# Altium PCB PCB_esp32.PcbDoc
Units mm, origin at the board's own origin, x right, y up, seen from the top; angles counter-clockwise.
Board outline 93.09 x 63.64 mm, 2 copper layers (Top Layer, Bottom Layer); 68 components, 49 nets, 270 pads, 139 vias.
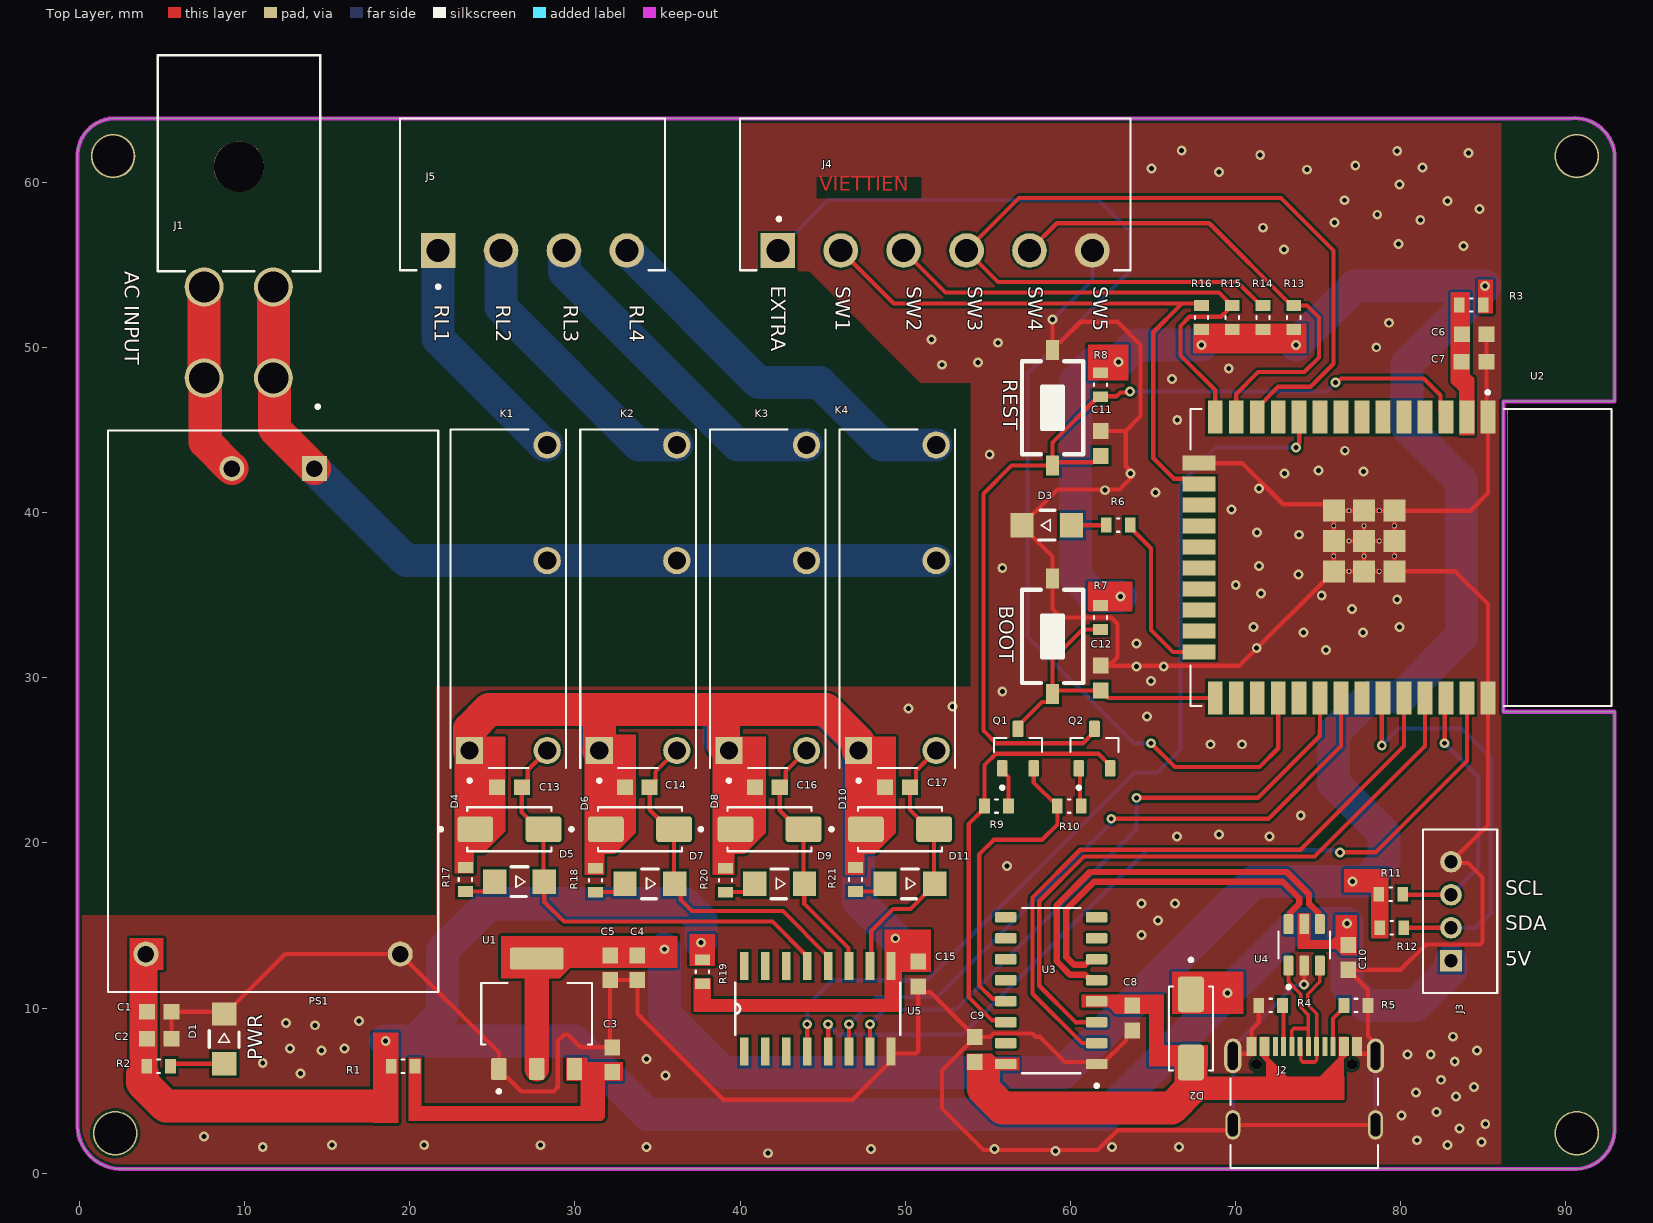
[diagram p0: Top Layer view]
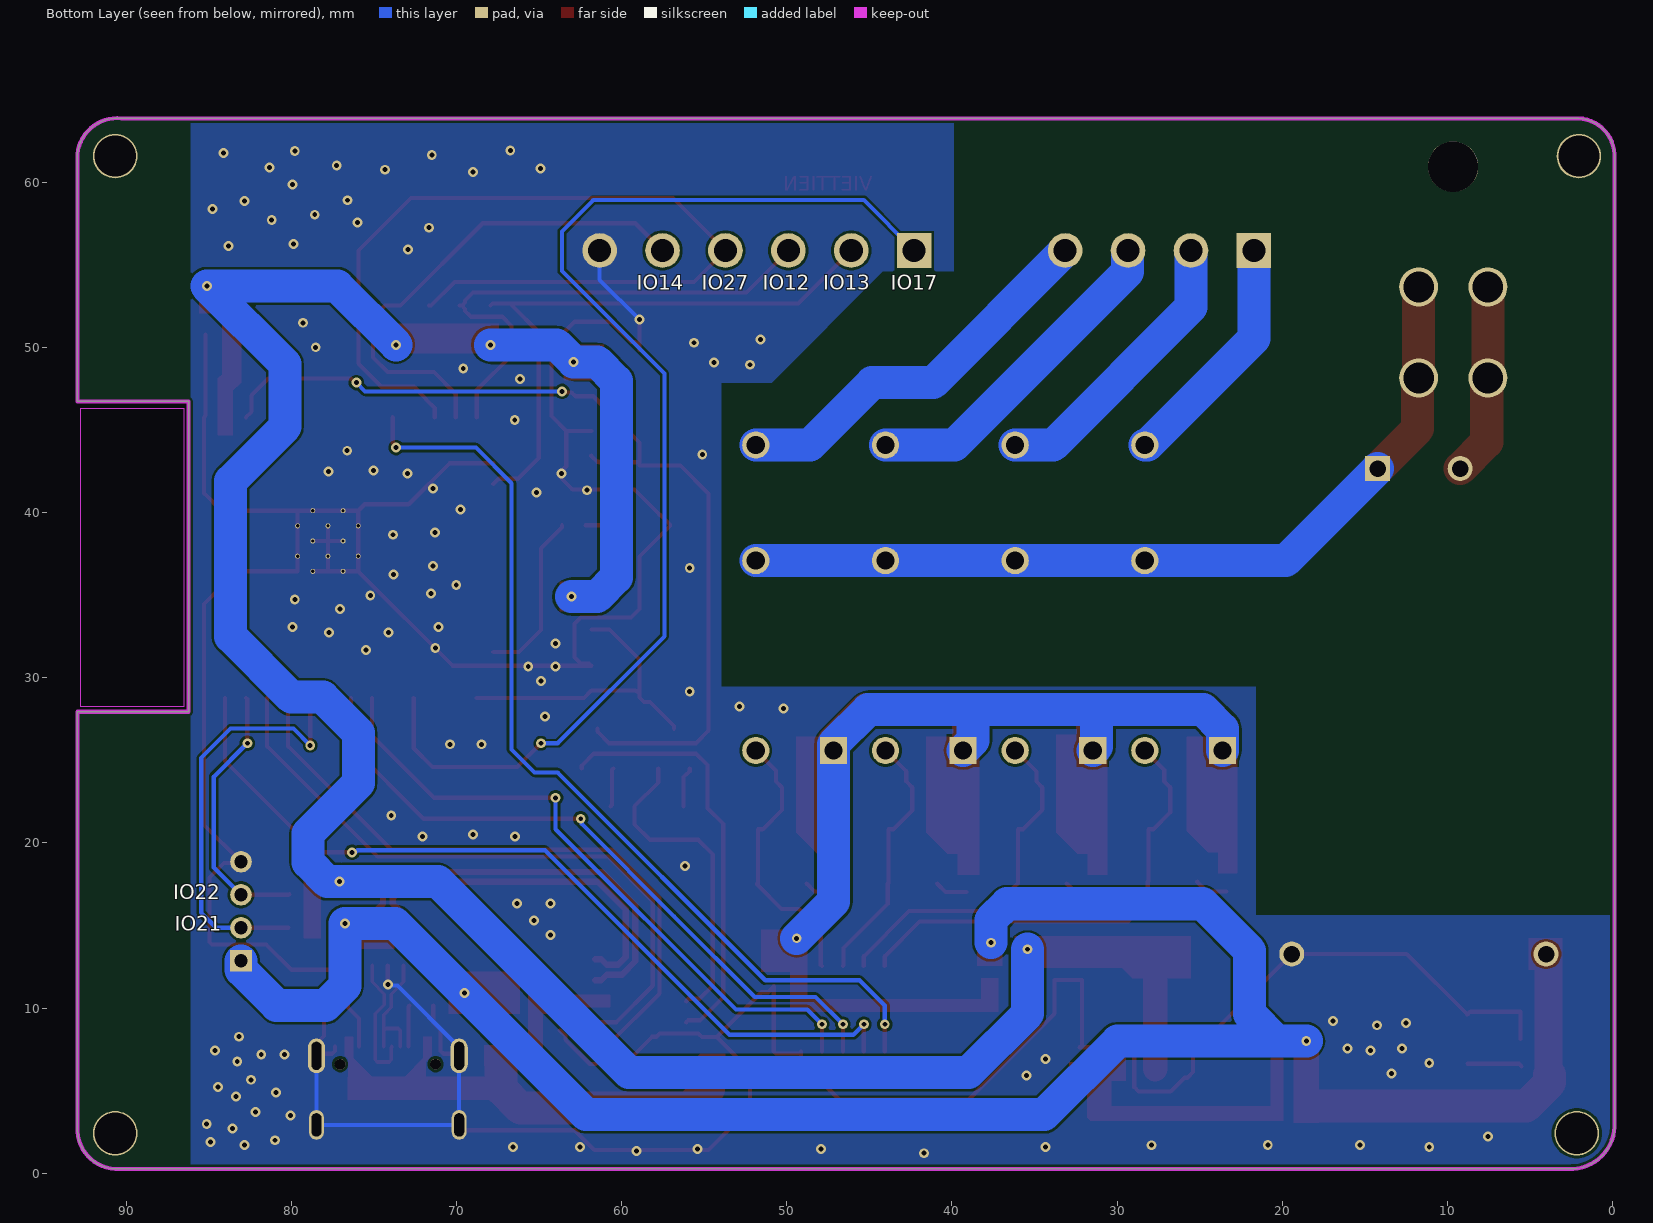
[diagram p1: Bottom Layer view, seen from below]
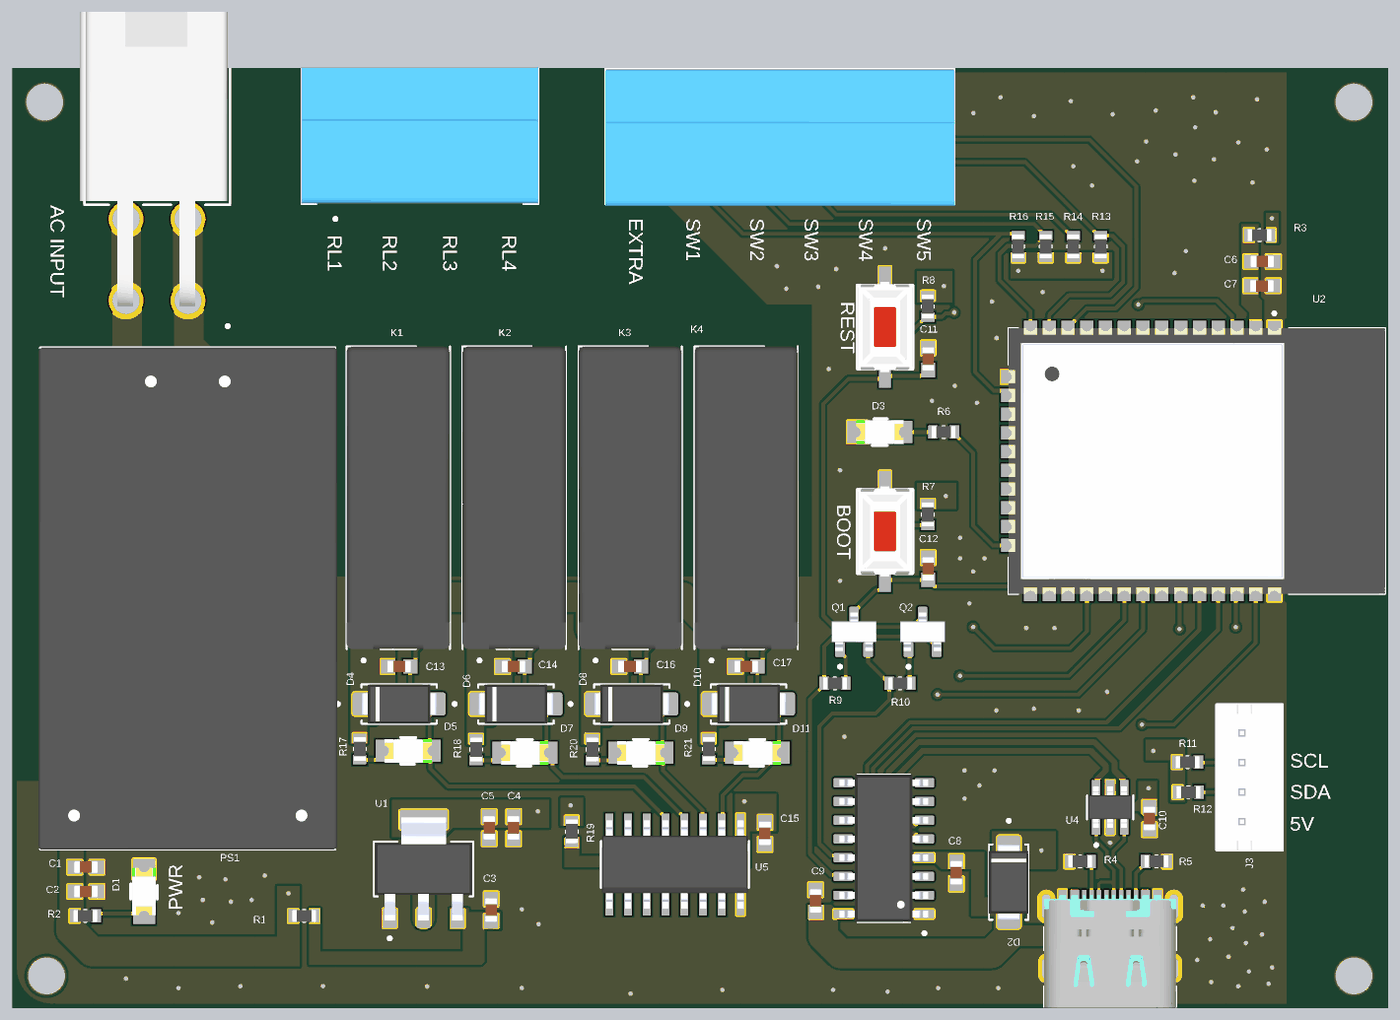
[diagram p2: 3D render of the assembled board from above, using the file's embedded part models]

## Layer stack, top to bottom
Top Solder: solder mask 0.0102, Solder Resist, Dk 3.5
Top Layer: signal copper 0.0356
Dielectric 1: dielectric 0.32, FR-4, Dk 4.8
Bottom Layer: signal copper 0.0356
Bottom Solder: solder mask 0.0102, Solder Resist, Dk 3.5

## Board outline
-0.127,2.794 -0.127,61.468 cw(c2.159,61.595) 2.032,63.881 90.297,63.881 cw(c90.551,61.468) 92.964,61.722 92.964,46.736 86.233,46.736 86.233,27.94 92.964,27.94 92.964,2.794 cw(c90.551,2.667) 90.678,0.254 2.667,0.254 cw(c2.54,2.921)

## Design rules (kind name [scope] priority, off if disabled: settings)
Clearance [All] p1: gap=0.154 ignorepadtopadclearanceinfootprint=FALSE
DiffPairsRouting [All] p1: maxlimit=0.5 minlimit=0.15 mostfreqgap=0.2 toplayer_minwidth=0.15 toplayer_maxwidth=0.387 toplayer_prefwidth=0.387 bottomlayer_minwidth=0.15 bottomlayer_maxwidth=0.387 bottomlayer_prefwidth=0.387 impedanceprofiledriven=TRUE impedanceprofileid={6402B947-823C-461C-932C-7CAD535EB74E} impedanceprofilevalue=90.000000 maxuncoupledlength=12.7
HoleSize [All] p1: absolutevalues=TRUE maxlimit=10 minlimit=0.025 maxpercent=80.000 minpercent=20.000
MinimumSolderMaskSliver [All] p1: minsoldermaskwidth=0.01
PolygonConnect [All] p1: connectstyle=Direct reliefconductorwidth=0.254 reliefentries=4 polygonreliefangle="90 Angle" airgapwidth=0.254
RoutingVias [All] p1: holewidth=0.3 width=0.6 viastyle="Through Hole" minholewidth=0.3 minwidth=0.6 maxholewidth=0.3 maxwidth=0.6
SilkToSolderMaskClearance [IsPad] p1: minsilkscreentomaskgap=0.154 clearancetoexposedcopper=TRUE
SolderMaskExpansion [All] p1: expansion=0.102 istentingtop=FALSE
Width [All] p1: maxlimit=5 minlimit=0.254 preferedwidth=2
26 further rules are at their usual default settings.

## Classes and differential pairs
component class vi_xu_ly: BOOT C6 C7 C8 C9 C10 C11 C12 D2 D3 J2 J3 J4 Q1 Q2 R3 R4 R5 R6 R7 R8 R9 R10 R11 R12 R13 R14 R15 R16 REST U2 U3 U4
component class relay: C13 C14 C15 C16 C17 D4 D5 D6 D7 D8 D9 D10 D11 J5 K1 K2 K3 K4 R17 R18 R19 R20 R21 U5
component class Nguon: C1 C2 C3 C4 C5 D1 J1 PS1 R1 R2 U1
differential pair U: +U_P -U_N
differential pair USB: +USB_P -USB_N

## Components (designator, comment, footprint, x,y, rotation, side; value= is the part's Value field where it differs from the comment)
BOOT "Nut Nhan 2 Chan SMD 3x6x2.5" PCBComponent_1 60.706,28.448 r90 top
C1 "0.1uF" CAPC1608X94N 4.826,9.779 r180 top
C2 "10uF" CAPC1608X94N 4.826,8.128 r180 top
C3 "10uF" CAPC1608X94N 32.258,6.87 r270 top
C4 "0.1uF" CAPC1608X94N 33.782,12.446 r90 top
C5 "10uF" CAPC1608X94N 32.131,12.446 r90 top
C6 "0.1uF" CAPC1608X94N 84.467,50.8 r180 top
C7 "0.1uF" CAPC1608X94N 84.455,49.149 r180 top
C8 "0.1uF" CAPC1608X94N 63.754,9.398 r90 top
C9 "0.1uF" CAPC1608X94N 54.229,7.493 r270 top
C10 "0.1uF" CAPC1608X94N 76.835,13.069 r270 top
C11 "0.1uF" CAPC1608X94N 61.849,44.196 r90 top
C12 "0.1uF" CAPC1608X94N 61.849,29.984 r90 top
C13 "0.1uF" CAPC1608X94N 26.035,23.368 r180 top
C14 "0.1uF" CAPC1608X94N 33.782,23.368 r180 top
C15 "0.1uF" CAPC1608X94N 50.8,12.065 r90 top
C16 "0.1uF" CAPC1608X94N 41.656,23.368 r180 top
C17 "0.1uF" CAPC1608X94N 49.542,23.368 r180 top
D1 "WL-SMCW_1206" WL-SMCW_1206 8.763,8.128 r270 top
D2 "B340A-E3/61T" DIOM5126X229N 67.31,8.763 r270 top
D3 "WL-SMCW_1206" WL-SMCW_1206 58.571,39.243 r0 top
D4 "B340A-E3/61T" DIOM5126X229N 26.035,20.828 r0 top
D5 "WL-SMCW_1206" WL-SMCW_1206 26.646,17.653 r180 top
D6 "B340A-E3/61T" DIOM5126X229N 33.942,20.828 r0 top
D7 "WL-SMCW_1206" WL-SMCW_1206 34.544,17.526 r180 top
D8 "B340A-E3/61T" DIOM5126X229N 41.783,20.828 r0 top
D9 "WL-SMCW_1206" WL-SMCW_1206 42.394,17.526 r180 top
D10 "B340A-E3/61T" DIOM5126X229N 49.69,20.828 r0 top
D11 "WL-SMCW_1206" WL-SMCW_1206 50.292,17.526 r180 top
J1 "39301040" CONN_5569-04A_MOL 7.544,53.67 r180 top
J2 "TypeC_12pin_12402012E212A" TypeC_12pin_12402012E212A 74.168,2.921 r0 top
J3 "B4B-PH-K-S" JST_B4B-PH-K-S 83.608,15.859 r270 top
J4 "TBP02R1-381-06BE" CUI_TBP02R1-381-06BE 42.291,55.88 r0 top
J5 "TBP02R1-381-04BE" CUI_TBP02R1-381-04BE 21.717,55.88 r0 top
K1 "HF46F_005-HS1" RELAY_HF46F_005-HS1 25.971,34.798 r90 top locked
K2 "HF46F_005-HS1" RELAY_HF46F_005-HS1 33.824,34.798 r90 top locked
K3 "HF46F_005-HS1" RELAY_HF46F_005-HS1 41.677,34.798 r90 top locked
K4 "HF46F_005-HS1" RELAY_HF46F_005-HS1 49.53,34.798 r90 top locked
PS1 "HLK-PM01" CONV_HLK-PM01 11.724,27.972 r270 top locked
Q1 "MMBT3904" TRANS_MMBT3904 56.835,25.711 r90 top
Q2 "MMBT3904" TRANS_MMBT3904 61.468,25.711 r90 top
R1 "0R" RES_ERJU03J474V 19.595,6.477 r0 top
R2 "10K" RES_ERJU03J474V 4.789,6.477 r0 top
R3 "0R" RES_ERJU03J474V 84.291,52.578 r180 top
R4 "5K1" RES_ERJU03J474V 72.136,10.16 r0 top
R5 "5K1" RES_ERJU03J474V 77.306,10.16 r180 top
R6 "10k" RES_ERJU03J474V 62.902,39.243 r180 top
R7 "10k" RES_ERJU03J474V 61.829,33.655 r270 top
R8 "10k" RES_ERJU03J474V 61.829,47.752 r270 top
R9 "1K" RES_ERJU03J474V 55.536,22.225 r180 top
R10 "1k" RES_ERJU03J474V 59.944,22.225 r180 top
R11 "10k" RES_ERJU03J474V 79.412,16.891 r0 top
R12 "10k" RES_ERJU03J474V 79.465,14.859 r0 top
R13 "10k" RES_ERJU03J474V 73.533,51.816 r90 top
R14 "10k" RES_ERJU03J474V 71.67,51.816 r90 top
R15 "10k" RES_ERJU03J474V 69.808,51.816 r90 top
R16 "10k" RES_ERJU03J474V 67.945,51.816 r90 top
R17 "10K" RES_ERJU03J474V 23.368,17.78 r270 top
R18 "10K" RES_ERJU03J474V 31.242,17.743 r270 top
R19 "0R" RES_ERJU03J474V 37.719,12.192 r90 top
R20 "10K" RES_ERJU03J474V 39.116,17.743 r270 top
R21 "10K" RES_ERJU03J474V 46.99,17.78 r270 top
REST "Nut Nhan 2 Chan SMD 3x6x2.5" PCBComponent_1 60.706,42.291 r90 top
U1 "AMS1117" SOT229P700X180-4N 27.686,9.652 r90 top
U2 "ESP32-WROOM-32" MODULE_ESP32-WROOM-32 80.034,37.284 r270 top
U3 "CH340C" CH340C 58.845,11.049 r180 top
U4 "USBLC6-2SC6" USBLC6-2SC6 74.168,13.828 r90 top
U5 "ULN2003AD" SOIC127P600X175-16N 44.704,9.957 r90 top

## Footprints (in the part's own frame and the unit in brackets; to place one, negate y for a bottom-side part, rotate by r counter-clockwise, add the part's x,y. Pads: shape width x height; smd on the part's side, far side on the other; paste and mask are expansions set on the pad)
CAPC1608X94N [mm]
  rect 0.97x0.94 smd paste+0 mask+0.102: 1(-0.75,0) 2(0.75,0)
  body extent -0.8,-0.4 0.8,0.4, height 0.94
CH340C [mm]
  rrect25% 1.31x0.62 smd: 1(-2.75,4.445) 2(-2.75,3.175) 3(-2.75,1.905) 4(-2.75,0.635) 5(-2.75,-0.635) 6(-2.75,-1.905) 7(-2.75,-3.175) 8(-2.75,-4.445) 9(2.75,-4.445) 10(2.75,-3.175) 11(2.75,-1.905) 12(2.75,-0.635) 13(2.75,0.635) 14(2.75,1.905) 15(2.75,3.175) 16(2.75,4.445)
  silkscreen extent -2.85,-5 1.78,5.85, body extent -3,-5 3,5, height 1.8
CONN_5569-04A_MOL [mil]
  round 93 hole 73 mask+4.02: 1(0,0) 2(0,217) 3(-165,217) 4(-165,0)
  round 120 hole 120 unplated mask+0: ""(-83,-287)
  silkscreen extent -277,-552 111,-38, body extent -270,-552 124,232, height 449
CONV_HLK-PM01 [mm]
  rect 1.508x1.508 / inner round 1.508 / far side rect 1.508x1.508 hole 1: 1(-14.7,2.5)
  round 1.508 hole 1: 2(-14.7,-2.5) 3(14.7,7.7) 4(14.7,-7.7)
  silkscreen extent -18.55,-10 17,10, body extent -17,-10.1 17,10.1, height 15
CUI_TBP02R1-381-04BE [mm]
  rect 2.1x2.1 / inner round 2.1 / far side rect 2.1x2.1 hole 1.4: 1(0,0)
  round 2.1 hole 1.4: 2(3.81,0) 3(7.62,0) 4(11.43,0)
  silkscreen extent -2.3,-2.3 13.73,8, body extent -2.3,-1.14 13.73,8.06, height 7.4
CUI_TBP02R1-381-06BE [mm]
  rect 2.1x2.1 / inner round 2.1 / far side rect 2.1x2.1 hole 1.4: 1(0,0)
  round 2.1 hole 1.4: 2(3.81,0) 3(7.62,0) 4(11.43,0) 5(15.24,0) 6(19.05,0)
  silkscreen extent -2.3,-1.2 21.35,8, body extent -2.3,-1.33 21.35,7.87, height 7.14
DIOM5126X229N [mm]
  rrect25% 2.17x1.57 smd: A(2.065,0) C(-2.065,0)
  silkscreen extent -4.25,-1.33 2.55,1.33, body extent -2.55,-1.33 2.55,1.33, height 2.29
JST_B4B-PH-K-S [mm]
  rect 1.308x1.308 / inner round 1.308 / far side rect 1.308x1.308 hole 0.8: 1(3,-0.55)
  round 1.308 hole 0.8: 2(1,-0.55) 3(-1,-0.55) 4(-3,-0.55)
  silkscreen extent -4.95,-2.25 4.95,2.25, body extent -4.95,-2.21 4.95,2.29, height 6.05
MODULE_ESP32-WROOM-32 [mm]
  rect 2x0.9 smd: 1(-8.5,5.26) 2(-8.5,3.99) 3(-8.5,2.72) 4(-8.5,1.45) 5(-8.5,0.18) 6(-8.5,-1.09) 7(-8.5,-2.36) 8(-8.5,-3.63) 9(-8.5,-4.9) 10(-8.5,-6.17) 11(-8.5,-7.44) 12(-8.5,-8.71) 13(-8.5,-9.98) 14(-8.5,-11.25) 25(8.5,-11.25) 26(8.5,-9.98) 27(8.5,-8.71) 28(8.5,-7.44) 29(8.5,-6.17) 30(8.5,-4.9) 31(8.5,-3.63) 32(8.5,-2.36) 33(8.5,-1.09) 34(8.5,0.18) 35(8.5,1.45) 36(8.5,2.72) 37(8.5,3.99) 38(8.5,5.26)
  rect 0.9x2 smd: 15(-5.715,-12.25) 16(-4.445,-12.25) 17(-3.175,-12.25) 18(-1.905,-12.25) 19(-0.635,-12.25) 20(0.635,-12.25) 21(1.905,-12.25) 22(3.175,-12.25) 23(4.445,-12.25) 24(5.715,-12.25)
  rect 1.33x1.33 smd: 39_1(-2.835,-0.405) 39_2(-1,-0.405) 39_3(0.835,-0.405) 39_4(-2.835,-2.24) 39_5(-1,-2.24) 39_6(0.835,-2.24) 39_7(-2.835,-4.075) 39_8(-1,-4.075) 39_9(0.835,-4.075)
  round 0.3 hole 0.2: 39_10(-1.917,-0.405) 39_11(-0.082,-0.405) 39_12(-2.835,-1.322) 39_13(-1,-1.322) 39_14(0.835,-1.322) 39_15(-1.917,-2.24) 39_16(-0.082,-2.24) 39_17(-2.835,-3.157) 39_18(-1,-3.157) 39_19(0.835,-3.157) 39_20(-1.917,-4.075) 39_21(-0.082,-4.075)
  Keep-Out Layer region: 9,6.45 -9,6.45 -9,12.75 9,12.75
  Keep-Out Layer region: 9,6.45 -9,6.45 -9,12.75 9,12.75
  silkscreen extent -10.1,-12.75 9,12.75, body extent -9,-12.75 9,12.75, height 3.2
PCBComponent_1 [mm]
  rect 1.2x0.8 smd: 1(0.564,1.778) 2(7.564,1.778)
  silkscreen extent 1.24,-0.08 6.88,3.63, body extent 1.01,-0.07 7.11,3.63, height 2.5
RELAY_HF46F_005-HS1 [mm]
  rect 1.65x1.65 / inner round 1.65 / far side rect 1.65x1.65 hole 1.1: 1(-9.2,2.35)
  round 1.65 hole 1.1: 2(-9.2,-2.35) 3(2.3,-2.35) 4(9.3,-2.35)
  silkscreen extent -11.12,-3.5 10.25,3.5, body extent -10.25,-3.5 10.25,3.5, height 15.6
RES_ERJU03J474V [mm]
  rect 0.65x0.9 smd: 1(-0.725,0) 2(0.725,0)
  silkscreen extent -0.08,-0.4 0.08,0.4, body extent -0.8,-0.4 0.8,0.4, height 0.45
SOIC127P600X175-16N [mil]
  rect 67x21 smd: 1(-102,175) 2(-102,125) 3(-102,75) 4(-102,25) 5(-102,-25) 6(-102,-75) 7(-102,-125) 8(-102,-175) 9(102,-175) 10(102,-125) 11(102,-75) 12(102,-25) 13(102,25) 14(102,75) 15(102,125) 16(102,175)
  silkscreen extent -62,-197 62,197, body extent -118,-195 118,195, height 69
SOT229P700X180-4N [mm]
  rrect15% 1.31x0.93 smd: 1(-3.345,2.29) 2(-3.345,0) 3(-3.345,-2.29)
  rrect15% 1.31x3.24 smd: 2(3.345,0)
  silkscreen extent -4.8,-3.36 1.86,3.36, body extent -3.5,-3.25 3.5,3.25, height 1.8
TRANS_MMBT3904 [mm]
  rrect25% 1x0.65 smd paste+0 mask+0.102: 1(-1.2,0.95) 2(-1.2,-0.95) 3(1.2,0)
  silkscreen extent -2.46,-1.45 0.65,1.45, body extent -1.3,-1.52 1.3,1.52, height 1.3
TypeC_12pin_12402012E212A [mm]
  rect 0.6x1.14 smd: A1_B12(-3.2,4.75) A4_B9(-2.4,4.75) B1_A12(3.2,4.75) B4_A9(2.4,4.75)
  rect 0.3x1.14 smd: A5(-1.25,4.75) A6(-0.25,4.75) A7(0.25,4.75) A8(1.25,4.75) B5(1.75,4.75) B6(0.75,4.75) B7(-0.75,4.75) B8(-1.75,4.75)
  oval 1.05x2.1 hole 0.6 slot 1.7 at 90 deg: SH1(-4.32,4.18) SH2(4.32,4.18)
  oval 0.9x1.8 hole 0.6 slot 1.4 at 90 deg: SH3(-4.32,0) SH4(4.32,0)
  round 0.65 hole 0.65 unplated: ""(-2.89,3.68) ""(2.89,3.68)
  silkscreen extent -4.47,-2.6 4.47,2.81, body extent -4.47,-2.65 4.47,4.95, height 3.15
USBLC6-2SC6 [mm]
  rrect25% 1.21x0.59 smd: 1(-1.255,0.95) 2(-1.255,0) 3(-1.255,-0.95) 4(1.255,-0.95) 5(1.255,0) 6(1.255,0.95)
  silkscreen extent -2.65,-1.57 0.81,1.56, body extent -1.4,-1.46 1.4,1.46, height 1.44
WL-SMCW_1206 [mm]
  rect 1.4x1.5 smd: 1(-1.5,0) 2(1.5,0)
  silkscreen extent -0.5,-0.9 0.5,0.9, body extent -1.6,-0.8 1.6,0.8, height 0.68

## Part data
C1 C2 C3 C4 C5 C6 C7 C8 C9 C10 C11 C12 C13 C14 C15 C16 C17: library part cap_0603_VJ0603D3R9DXCAP, "cap 0603 (1608 Metric)", Package="1608 Vishay Vitramon", Check_prices=https://www.snapeda.com/parts/VJ0603D3R9DXCAP/Vishay/view-part/?ref=eda, MF="Vishay Vitramon", MP=VJ0603D3R9DXCAP, SnapEDA_Link=https://www.snapeda.com/parts/VJ0603D3R9DXCAP/Vishay/view-part/?ref=snap
D1 D5 D7 D9 D11: "1206, Blue Typ.(@20mA): 470nm, 145mcd, 3.2V, 140Â° InGaN", Package="1206 Wurth Electronics", Check_prices=https://www.snapeda.com/parts/150120BS75000/Wurth+Electronics/view-part/?ref=eda, MF="Wurth Electronics", MP=150120BS75000, SnapEDA_Link=https://www.snapeda.com/parts/150120BS75000/Wurth+Electronics/view-part/?ref=snap
D2 D4 D6 D8 D10: "Diode Schottky 40 V 3A Surface Mount DO-214AC (SMA)", Package="DO-214 Vishay Semiconductor", Check_prices=https://www.snapeda.com/parts/B340A-E3/61T/Vishay/view-part/?ref=eda, MF="Vishay Semiconductor", MP=B340A-E3/61T, SnapEDA_Link=https://www.snapeda.com/parts/B340A-E3/61T/Vishay/view-part/?ref=snap
D3: "1206, Blue Typ.(@20mA): 470nm, 145mcd, 2.9V, 140Â° InGaN", Package="1206 Wurth Electronics", Check_prices=https://www.snapeda.com/parts/150120BS75000/Wurth+Electronics/view-part/?ref=eda, MF="Wurth Electronics", MP=150120BS75000, SnapEDA_Link=https://www.snapeda.com/parts/150120BS75000/Wurth+Electronics/view-part/?ref=snap
J1: "Conn Wire to Board HDR 4 POS 4.2mm Solder RA Side Entry Thru-Hole Mini-Fit Jrâ„¢ Bag", Package=None, Check_prices=https://www.snapeda.com/parts/39301040/Molex/view-part/?ref=eda, MF=Molex, MP=39301040, SnapEDA_Link=https://www.snapeda.com/parts/39301040/Molex/view-part/?ref=snap
J2: "USB2.0, Type C, Top mount, CH 1.68mm, Dual Row SMT", Package=None, Availability="In Stock", Check_prices=https://www.snapeda.com/parts/12402012E212A/Amphenol/view-part/?ref=eda, MF="Amphenol ICC (Commercial Products)", MP=12402012E212A, Price=None, Purchase-URL=https://pricing.snapeda.com/search/part/12402012E212A/?ref=eda, SnapEDA_Link=https://www.snapeda.com/parts/12402012E212A/Amphenol/view-part/?ref=snap
J3: Package=None, Availability=Unavailable, MF="{'manufacturer': u'JST Sales America Inc.'}", MP=B4B-PH-K-S, Price=None
J4 J5: "2~24 Poles, Pluggable,Receptacle, Horizontal, 3.81 Pitch, Terminal Block Connector", Package=None, MF="Same Sky"
  J4: Check_prices=https://www.snapeda.com/parts/TBP02R1-381-06BE/Same+Sky/view-part/?ref=eda, MP=TBP02R1-381-06BE, SnapEDA_Link=https://www.snapeda.com/parts/TBP02R1-381-06BE/Same+Sky/view-part/?ref=snap
  J5: Check_prices=https://www.snapeda.com/parts/TBP02R1-381-04BE/Same+Sky/view-part/?ref=eda, MP=TBP02R1-381-04BE, SnapEDA_Link=https://www.snapeda.com/parts/TBP02R1-381-04BE/Same+Sky/view-part/?ref=snap
K1 K2 K3 K4: "Relay: electromagnetic; SPST-NO; Ucoil: 5VDC; 5A/250VAC; 5A/30VDC", Package=None, Check_prices=https://www.snapeda.com/parts/HF46F/005-HS1/Hongfa/view-part/?ref=eda, MF=Hongfa, MP=HF46F/005-HS1, SnapEDA_Link=https://www.snapeda.com/parts/HF46F/005-HS1/Hongfa/view-part/?ref=snap
PS1: "The HLK-PM01 is a small size low cost AC to DC converter which can take in 110V/220V AC at 50/60 Hz and give 5V 3W output. The module is can be used in designs which run on 5V and needs to be powered form the AC mains.", Package=None, Check_prices=https://www.snapeda.com/parts/hlk-pm01/Hi-link/view-part/?ref=eda, MF=Hi-link, MP=hlk-pm01, SnapEDA_Link=https://www.snapeda.com/parts/hlk-pm01/Hi-link/view-part/?ref=snap
Q1 Q2: "BJT, SOT-23, 40V, 200mA, NPN, 0.35W, 150Â°C", Package="SOT-23 Diotec", Check_prices=https://www.snapeda.com/parts/MMBT3904/Diotec/view-part/?ref=eda, MF="Diotec Semiconductor", MP=MMBT3904, SnapEDA_Link=https://www.snapeda.com/parts/MMBT3904/Diotec/view-part/?ref=snap
R1 R2 R3 R4 R5 R6 R7 R8 R9 R10 R11 R12 R13 R14 R15 R16 R17 R18 R19 R20 R21: library part res_0603_ERJU03J474V, "0603 Anti-Sulfurated", Package="1608-2 Panasonic", Check_prices=https://www.snapeda.com/parts/ERJU03J474V/Panasonic/view-part/?ref=eda, MF=Panasonic, MP=ERJU03J474V, SnapEDA_Link=https://www.snapeda.com/parts/ERJU03J474V/Panasonic/view-part/?ref=snap
U1: "1A LOW DROPOUT VOLTAGE REGULATOR SOT-223", Package="SOT-223 Seeed Technology", Check_prices=https://www.snapeda.com/parts/AMS1117/Advanced+Monolithic+Systems/view-part/?ref=eda, MF="Advanced Monolithic Systems", MP=AMS1117, SnapEDA_Link=https://www.snapeda.com/parts/AMS1117/Advanced+Monolithic+Systems/view-part/?ref=snap
U2: "Bluetooth, WiFi 802.11b/g/n, Bluetooth v4.2 +EDR, Class 1, 2 and 3 Transceiver Module 2.4GHz ~ 2.5GHz Antenna Not Included, U.FL Surface Mount", Package="Module Espressif Systems", Availability="In Stock", Check_prices=https://www.snapeda.com/parts/ESP32-WROOM-32/Espressif+Systems/view-part/?ref=eda, MF="Espressif Systems", MP=ESP32-WROOM-32, Price=None, Purchase-URL=https://pricing.snapeda.com/search/part/ESP32-WROOM-32/?ref=eda, SnapEDA_Link=https://www.snapeda.com/parts/ESP32-WROOM-32/Espressif+Systems/view-part/?ref=snap
U3: "USB to serial chip CH340", Package=None, Availability="Not in stock", Check_prices=https://www.snapeda.com/parts/CH340C/WCH/view-part/?ref=eda, MF=WCH, MP=CH340C, Price=None, SnapEDA_Link=https://www.snapeda.com/parts/CH340C/WCH/view-part/?ref=snap
U4: "17V Clamp 5A (8/20Âµs) Ipp Tvs Diode Surface Mount SOT-23-6", Package="SOT-23-6 STMicroelectronics", Availability="In Stock", Check_prices=https://www.snapeda.com/parts/USBLC6-2SC6/STMicroelectronics/view-part/?ref=eda, MF=STMicroelectronics, MP=USBLC6-2SC6, Price=None, Purchase-URL=https://pricing.snapeda.com/search/part/USBLC6-2SC6/?ref=eda, SnapEDA_Link=https://www.snapeda.com/parts/USBLC6-2SC6/STMicroelectronics/view-part/?ref=snap
U5: "50-V, 7-ch darlington transistor array, -20C to 70C", Package="SOIC-16 Texas Instruments", Check_prices=https://www.snapeda.com/parts/ULN2003AD/Texas+Instruments/view-part/?ref=eda, MF="Texas Instruments", MP=ULN2003AD, SnapEDA_Link=https://www.snapeda.com/parts/ULN2003AD/Texas+Instruments/view-part/?ref=snap
BOOT REST: Ma_Hang=MH001036, Ten="Nút Nhấn 2 Chân 3x6x2.5MM SMD"

## Free pads (board coordinates)
  round 2.7 hole 2.5 mask+0.102: 5(2.032,61.595) 5(2.159,2.413) 5(90.678,2.413) 5(90.678,61.595)

## Via types
v1: diameter 0.6, hole 0.3, Top Layer to Bottom Layer, tented both sides, 139 vias

## Nets (pads, with @x,y where several pads share a name; then routed paths per layer and width w, separated by ;. In a path a pad name is that pad's centre, name@x,y a point inside that pad or via, vN(x,y) a via of type N, cw(c..) or ccw(c..) an arc to the next point about the centre after c; other vN are vias at no path point)
3V3: C4.2 C5.2 R3.1 R7.1 R8.1 R11.1 R12.1 R13.1 R14.1 R15.1 R16.1 U1.2 | length 141
  Top Layer w1.5: U1.2@27.686,6.307 U1.2@27.686,12.997
  Bottom Layer w2: v1(35.425,13.56) 35.425,9.66 38.989,6.096 59.563,6.096 71.12,17.653 v1@76.837,17.653 ; v1(63.044,34.911) 61.497,34.911 60.325,36.083 60.325,47.964 61.497,49.135 v1(62.917,49.135) 63.947,50.165 v1(67.945,50.165) ; v1(73.66,50.165) 77.22,53.725 v1(85.125,53.725) 80.391,48.991 80.391,45.212 83.693,41.91 83.693,32.512 80.01,28.829 78.105,28.829 75.946,26.67 75.946,23.622 78.994,20.574 78.994,18.825 77.822,17.653 v1(77.089,17.653)
+3V3: C6.2 C7.2 R3.2 U2.2
+5: C1.2 C2.2 C10.1 D2.C J3.1 PS1.4 R1.1 R2.1 R19.2 U4.5 | length 117.1
  Top Layer w2: 3.81,5.969 3.81,5.49 5.236,4.064 18.143,4.064
  Bottom Layer w2: v1(18.542,8.001) 20.32,8.001 ; v1(37.644,13.956) 37.644,15.338 36.667,16.316 24.825,16.316 21.971,13.462 21.971,9.652 20.32,8.001 ; J3.1 83.058,12.319 80.899,10.16 77.939,10.16 76.768,11.332 v1(76.768,15.128) 76.753,15.113 73.726,15.113 62.169,3.556 34.417,3.556 29.972,8.001 20.32,8.001
  other v1: 69.521,10.908
+5V: C13.2 C14.2 C15.2 C16.2 C17.2 D4.C D6.C D8.C D10.C K1.1 K2.1 K3.1 K4.1 R17.1 R18.1 R19.1 R20.1 R21.1 U5.9 | length 75.9
  Top Layer w2: K1.1 23.621,26.895 24.793,28.067 31.496,28.067 ; K2.1 31.496,25.62 31.496,28.067 ; K3.1 38.989,25.936 38.989,28.067 ; K4.1 47.18,26.099 45.212,28.067 38.989,28.067 ; 31.496,28.067 38.989,28.067
  Bottom Layer w2: K1.1 23.621,26.895 24.793,28.067 31.242,28.067 ; K2.1 31.242,25.83 31.242,28.067 ; K3.1 38.735,26.19 38.735,28.067 ; v1(49.403,14.224) 47.18,16.447 K4.1 47.18,25.972 45.085,28.067 38.735,28.067 ; 31.242,28.067 38.735,28.067
BOOT: BOOT.1 C12.1 Q1.3 R7.2 U2.25 | length 19.1
  Top Layer w0.254: Q1.3 56.835,27.086 58.288,28.539 58.655,28.539 58.928,28.812 BOOT.1 ; R7.2 60.743,32.93 58.928,31.115 BOOT.1 ; U2.25 62.284,28.784 61.849,29.219 C12.1 59.15,29.234 BOOT.1
DTR: Q1.2 R10.2 U3.13 | length 19.4
  Top Layer w0.254: U3.13 55.95,10.559 55.29,10.559 54.483,11.366 54.483,19.304 55.372,20.193 58.293,20.193 59.219,21.119 R10.2 57.785,23.659 Q1.2
EXTRA_IO17: J4.1 U2.28 | length 73
  Top Layer w0.254: v1(64.897,26.035) 66.333,24.599 71.462,24.599 72.594,25.731 U2.28
  Bottom Layer w0.254: J4.1@42.684,55.487 J4.1 45.339,58.928 61.722,58.928 63.627,57.023 63.627,54.644 57.404,48.421 57.404,32.512 63.881,26.035 v1(64.897,26.035)
GND: BOOT.2 C1.1 C2.1 C3.1 C4.1 C5.1 C6.1 C7.1 C8.1 C9.1 C10.2 C11.2 C12.2 C15.1 D1.1 D3.1 J2.A1_B12 J2.B1_A12 J2.SH1 J2.SH2 J2.SH3 J2.SH4 J3.4 J4.6 PS1.3 R4.1 R5.1 REST.2 U1.1 U2.1 U2.15 U2.38 U2.39_1 U2.39_2 U2.39_3 U2.39_4 U2.39_5 U2.39_6 U2.39_7 U2.39_8 U2.39_9 U2.39_10 U2.39_11 U2.39_12 U2.39_13 U2.39_14 U2.39_15 U2.39_16 U2.39_17 U2.39_18 U2.39_19 U2.39_20 U2.39_21 U3.1 U4.2 U5.8 | length 298.4
  Top Layer w0.254: C2.1 C1.1 8.612,9.779 D1.1 8.813,9.628 12.457,13.272 PS1.3 25.396,7.3 U1.1 25.396,6.117 25.734,5.779 25.924,5.779 26.75,4.953 28.702,4.953 28.956,5.207 28.956,8.001 29.359,8.404 29.569,8.404 30.353,7.62 C3.1 32.131,7.747 C5.1 C4.1 33.782,9.652 38.989,4.445 46.812,4.445 49.149,6.782 U5.8 49.276,7.239 50.651,7.239 50.8,7.388 C15.1@50.8,11.3 ; C15.1 C15.1@50.8,11.3 ; REST.2 REST.2@58.928,50.055 ; v1(58.928,51.689) REST.2@58.928,50.055 ; C11.2 63.361,44.946 ; C8.1 63.411,8.305 63.411,8.075 61.94,6.604 U3.1 61.468,6.731 59.69,6.731 58.166,8.255 57.912,8.255 57.702,8.465 55.369,8.465 55.147,8.243 C9.1 ; U2.15 70.412,42.999 72.898,40.513 75.565,40.513 U2.39_7 ; J2.SH1 69.975,7.228 70.795,7.228 70.968,7.401 J2.A1_B12 70.968,8.668 71.411,9.11 R4.1 ; v1(74.168,11.43) U4.2 ; U2.39_18 U2.39_5 ; J2.B1_A12 77.368,7.401 77.541,7.228 78.361,7.228 J2.SH2 78.488,7.841 78.031,8.298 R5.1 78.031,11.108 76.835,12.304 C10.2 80.01,12.319 81.534,13.843 84.814,13.843 84.963,13.992 84.963,17.907 84.093,18.777 83.14,18.777 J3.4 85.294,21.095 U2.38 85.294,34.467 83.312,36.449 U2.39_3 U2.39_11 U2.39_2 U2.39_10 U2.39_1 ; U2.39_15 U2.39_5 ; J2.SH4 J2.SH3 69.848,2.896 69.55,2.598 62.869,2.598 61.668,1.397 54.737,1.397 52.224,3.91 52.224,6.223 54.229,8.228 C9.1 ; U2.39_14 U2.39_6 ; U2.39_13 U2.39_5 ; C6.1 85.205,50.788 C7.1 85.205,45.873 U2.1 85.294,41.181 84.223,40.11 84.214,40.119 U2.39_1 ; C15.1@50.8,11.3 51.143,10.957 51.53,10.957 54.229,8.258 C9.1 ; REST.2@58.928,50.055 59.201,50.328 59.401,50.328 60.635,51.562 62.865,51.562 64.262,50.165 64.262,45.847 63.361,44.946 ; 63.361,44.946 63.361,42.811 63.776,42.396 63.776,42.186 62.992,41.402 59.23,41.402 57.694,39.866 57.644,39.866 57.071,39.293 D3.1 57.071,39.193 58.928,37.336 BOOT.2 58.928,34.163 59.436,33.655 62.484,33.655 62.865,33.274 62.865,31.242 62.484,30.861 61.976,30.861 C12.2 70.244,30.734 U2.39_9 ; U2.39_9 U2.39_21 U2.39_8 U2.39_20 U2.39_7 ; U2.39_9 U2.39_19 U2.39_6 ; U2.39_7 U2.39_17 U2.39_4 U2.39_12 U2.39_1 ; U2.39_6 U2.39_16 U2.39_5
  Bottom Layer w0.254: v1(58.928,51.689) 61.341,54.102 J4.6 ; v1(74.168,11.43) 74.102,11.364 73.586,11.364 69.848,7.626 J2.SH1 J2.SH3 J2.SH4 J2.SH2
  other v1: 41.702,1.208 59.101,1.335 47.925,1.462 55.418,1.462 11.095,1.589 34.336,1.589 62.53,1.589 66.594,1.589 27.927,1.692 15.286,1.716 20.874,1.716 82.843,1.715 84.896,1.881 81.012,1.992 7.539,2.224 83.564,2.713 85.136,2.986 80.068,3.49 82.177,3.712 83.358,4.637 80.945,4.891 84.452,5.21 82.455,5.654 35.479,5.907 13.381,6.034 11.095,6.669 83.287,6.764 34.336,6.923 80.437,7.177 81.834,7.177 14.651,7.431 84.628,7.431 12.746,7.558 16.048,7.558 83.176,8.262 14.27,8.955 12.492,9.082 16.937,9.209 64.308,14.416 65.324,15.305 64.308,16.321 66.34,16.321 56.18,18.607 66.467,20.385 72.055,20.385 69.007,20.512 73.96,21.655 68.499,25.973 70.404,25.973 64.647,27.644 50.211,28.132 52.878,28.259 55.884,29.168 64.901,29.803 64.012,30.692 65.663,30.692 75.484,31.688 71.293,31.815 64.012,32.089 74.13,32.745 77.733,32.745 71.099,33.088 79.929,33.085 77.075,34.175 79.802,34.736 75.23,34.99 71.547,35.117 70.023,35.625 73.833,36.26 55.884,36.661 71.42,36.768 73.844,38.664 71.299,38.807 69.769,40.197 65.155,41.233 62.107,41.36 71.42,41.467 63.653,42.376 72.986,42.381 77.77,42.483 75.045,42.553 55.122,43.519 76.627,43.753 66.48,45.613 66.171,48.091 69.6,48.726 52.243,48.96 54.402,49.087 78.533,50.016 55.626,50.292 51.608,50.484 79.294,51.5 72.944,55.945 83.813,56.149 79.875,56.266 71.68,57.258 75.996,57.579 81.199,57.723 78.592,58.045 84.775,58.395 82.85,58.866 76.609,58.92 79.929,59.882 69.007,60.644 74.341,60.771 64.913,60.845 81.326,60.898 77.262,61.025 71.505,61.662 84.12,61.787 66.751,61.924 79.802,61.914
L: J1.3 J1.4 K1.3 K2.3 K3.3 K4.3 PS1.1 | length 52
  Top Layer w2: J1.4 J1.3 11.804,48.089 11.804,45.092 PS1.1
  Bottom Layer w2: PS1.1 19.798,37.098 K1.3 K2.3 K3.3 K4.3
LED_IO2: R6.1 U2.24 | length 10.3
  Top Layer w0.254: R6.1 63.627,39.118 64.897,37.848 64.897,32.902 66.23,31.569 U2.24
N: J1.1 J1.2 PS1.2 | length 11.7
  Top Layer w2: J1.1 J1.2 7.613,48.089 7.613,44.283 PS1.2
NetC3_2: C3.2 R1.2 U1.3
NetD1_2: D1.2 R2.2 | length 3.3
  Top Layer w0.254: R2.2 5.665,6.628 D1.2
NetD3_2: D3.2 R6.2 | length 2.1
  Top Layer w0.254: D3.2 R6.2
NetD5_2: D5.2 R17.2 | length 2
  Top Layer w0.254: R17.2 24.573,17.055 25.146,17.628 D5.2
NetD7_2: D7.2 R18.2 | length 2
  Top Layer w0.254: R18.2 32.536,17.018 D7.2
NetD9_2: D9.2 R20.2 | length 2
  Top Layer w0.254: R20.2 40.386,17.018 D9.2
NetD11_2: D11.2 R21.2 | length 2
  Top Layer w0.254: R21.2 48.321,17.055 D11.2
NetJ2_A5: J2.A5 R4.2 | length 2.5
  Top Layer w0.254: R4.2 72.918,10.103 J2.A5
NetJ2_B5: J2.B5 R5.2 | length 2.8
  Top Layer w0.254: J2.B5 75.918,9.372 76.581,10.035 R5.2
NetJ5_1: J5.1 K1.4 | length 14.6
  Bottom Layer w2: J5.1 21.717,50.546 28.165,44.098 K1.4
NetJ5_2: J5.2 K2.4 | length 17.5
  Bottom Layer w2: J5.2 25.527,52.451 33.88,44.098 K2.4
NetJ5_3: J5.3 K3.4 | length 20.3
  Bottom Layer w2: J5.3 29.356,55.861 29.356,54.591 30.226,53.721 39.849,44.098 K3.4
NetJ5_4: J5.4 K4.4 | length 23.6
  Bottom Layer w2: J5.4 41.148,47.879 44.831,47.879 48.612,44.098 K4.4
NetQ1_1: Q1.1 R9.1 | length 2.5
  Top Layer w0.254: Q1.1 55.885,24.336 56.083,24.138 56.112,24.138 56.261,23.989 R9.1
NetQ2_1: Q2.1 R10.1 | length 2.3
  Top Layer w0.254: Q2.1 60.593,24.436 60.593,22.3 R10.1
NetU2_34: U2.34 U3.2 | length 40.2
  Top Layer w0.254: U3.2 60.706,7.874 57.713,10.867 57.713,16.692 60.606,19.585 73.941,19.585 80.214,25.858 U2.34
NetU2_35: U2.35 U3.3 | length 39.7
  Top Layer w0.254: U3.3 60.325,9.144 58.121,11.348 58.121,16.465 60.833,19.177 74.803,19.177 81.484,25.858 U2.35
RELAY_1: C13.1 D4.A D5.1 K1.2 U5.13 | length 28.4
  Top Layer w0.254: K1.2 27.143,24.42 27.143,23.711 26.8,23.368 C13.1 26.785,21.843 27.8,20.828 D4.A 28.1,17.699 D5.1 28.146,16.431 29.337,15.24 41.961,15.24 44.069,13.132 U5.13
RELAY_2: C14.1 D6.A D7.1 K2.2 U5.12 | length 21.6
  Top Layer w0.254: K2.2 34.89,24.314 34.89,23.711 34.547,23.368 C14.1 34.532,22.003 35.707,20.828 D6.A 36.007,17.563 36.415,17.155 36.415,16.544 37.084,15.875 42.596,15.875 45.339,13.132 U5.12
RELAY_3: C16.1 D8.A D9.1 K3.2 U5.11 | length 15.6
  Top Layer w0.254: K3.2 42.764,24.335 42.764,23.711 42.421,23.368 C16.1 42.406,21.97 43.548,20.828 D8.A 43.848,17.572 D9.1 43.894,16.304 46.567,13.631 46.567,12.589 U5.11
RELAY_4: C17.1 D10.A D11.1 K4.2 U5.10 | length 16.7
  Top Layer w0.254: U5.10 47.946,12.614 47.946,14.672 49.276,16.002 50.318,16.002 51.792,17.476 D11.1 51.755,17.563 D10.A 51.455,20.828 50.292,21.991 C17.1 50.307,23.368 50.65,23.711 50.65,24.368 K4.2
REST: C11.1 Q2.3 R8.2 REST.1 U2.3 | length 58.2
  Top Layer w0.254: Q2.3 61.468,26.736 60.767,26.035 55.499,26.035 54.737,26.797 54.737,41.148 56.444,42.855 REST.1 REST.1@58.928,43.055 ; C11.1 61.849,43.431 61.506,43.088 61.39,43.088 61.357,43.055 REST.1@58.928,43.055 ; v1(63.611,47.347) 63.545,47.281 63.032,47.281 62.803,47.051 61.728,47.051 58.928,44.251 REST.1@58.928,43.055 ; v1(76.073,47.879) 76.141,47.879 76.395,48.133 81.407,48.133 82.431,47.109 82.431,46.107 U2.3
  Bottom Layer w0.254: v1(63.611,47.347) 75.541,47.347 v1(76.073,47.879)
RTS: Q2.2 R9.2 U3.14 | length 25.7
  Top Layer w0.254: U3.14 55.983,9.256 55.256,9.256 53.848,10.664 53.848,21.137 54.811,22.1 R9.2 54.811,24.712 55.499,25.4 61.704,25.4 62.418,24.686 Q2.2
SCL: J3.3 R11.2 U2.36 | length 16.4
  Top Layer w0.254: R11.2 80.169,16.859 J3.3 ; v1(82.677,26.035) 82.677,28.707 U2.36
  Bottom Layer w0.254: v1(82.677,26.035) 84.709,24.003 84.709,18.51 J3.3
SDA: J3.2 R12.2 U2.33 | length 25.7
  Top Layer w0.254: v1(78.867,25.908) 78.867,28.707 U2.33 ; R12.2 J3.2
  Bottom Layer w0.254: v1(78.867,25.908) 79.883,26.924 83.693,26.924 85.471,25.146 85.471,15.77 84.56,14.859 J3.2
SIG1_IO25: U2.10 U5.4 | length 57.8
  Top Layer w0.254: U5.4 v1(44.069,9.017) ; v1(73.66,43.942) 73.66,44.036 73.864,44.24 U2.10
  Bottom Layer w0.254: v1(44.069,9.017) 44.069,10.16 45.593,11.684 51.308,11.684 63.881,24.257 65.278,24.257 66.675,25.654 66.675,41.783 68.834,43.942 v1(73.66,43.942)
SIG2_IO23: U2.37 U5.5 | length 51.4
  Top Layer w0.254: U5.5 v1(45.339,9.017) ; v1(76.327,19.431) 78.486,19.431 84.024,24.969 U2.37
  Bottom Layer w0.254: v1(45.339,9.017) 45.974,8.382 53.467,8.382 64.643,19.558 76.005,19.558 76.066,19.497 76.261,19.497 v1(76.327,19.431)
SIG3_IO19: U2.31 U5.6 | length 41.5
  Top Layer w0.254: U5.6 v1(46.609,9.017) ; v1(62.484,21.463) 72.009,21.463 76.404,25.858 U2.31
  Bottom Layer w0.254: v1(46.609,9.017) 48.26,10.668 51.943,10.668 56.799,15.524 62.418,21.143 62.418,21.397 v1(62.484,21.463)
SIG4_IO18: U2.30 U5.7 | length 39.6
  Top Layer w0.254: U5.7 v1(47.879,9.017) ; v1(64.008,22.733) 71.374,22.733 75.134,26.493 U2.30
  Bottom Layer w0.254: v1(47.879,9.017) 48.768,9.906 53.086,9.906 64.008,20.828 v1(64.008,22.733)
SWITCH1_IO13: J4.2 R16.2 U2.16 | length 36.6
  Top Layer w0.254: J4.2 49.308,52.673 67.813,52.673 R16.2 ; 66.675,52.578 65.024,50.927 65.024,43.307 66.279,42.052 67.461,42.052 U2.16
SWITCH2_IO12: J4.3 R15.2 U2.14 | length 31.3
  Top Layer w0.254: J4.3 52.451,53.34 69.004,53.34 69.485,52.859 69.485,52.739 R15.2@69.683,52.541 ; U2.14 68.784,47.421 66.675,49.53 66.675,51.308 67.232,51.865 69.131,51.865 69.485,52.218 69.485,52.343 R15.2@69.683,52.541 ; R15.2 R15.2@69.683,52.541
SWITCH3_IO27: J4.4 R14.2 U2.12 | length 57.3
  Top Layer w0.254: U2.12 71.324,46.334 71.848,46.858 71.848,46.885 72.588,47.625 74.549,47.625 75.946,49.022 75.946,55.88 72.771,59.055 56.896,59.055 J4.4 55.626,53.975 70.111,53.975 71.545,52.541 R14.2
SWITCH4_IO14: J4.5 R13.2 U2.13 | length 30.3
  Top Layer w0.254: J4.5 59.182,57.531 68.418,57.531 73.408,52.541 74.332,52.541 75.057,51.816 75.057,49.403 74.168,48.514 71.374,48.514 70.054,47.194 U2.13
U_N: U3.6 U4.6 | length 22.1
  Top Layer w0.387: U3.6 61.25,12.954 60.909,12.612 60.227,12.612 59.769,13.07 59.769,15.981 61.441,17.653 72.864,17.653 73.875,16.643 73.875,16.322 73.648,16.095 73.643,16.095 73.32,15.772 73.32,15.184 U4.6
U_P: U3.5 U4.4 | length 25
  Top Layer w0.387: U3.5 61.25,11.684 60.908,12.025 59.984,12.025 59.182,12.827 59.182,16.224 61.198,18.24 73.107,18.24 74.461,16.886 74.461,16.322 74.688,16.095 74.693,16.095 75.016,15.772 75.016,15.184 U4.4
USB_N: J2.A7 J2.B7 U4.1 | length 7.5
  Top Layer w0.219: U4.1 73.218,11.583 73.958,10.843 73.958,10.039 74.422,9.575 74.422,8.635 ; J2.B7 73.406,7.683 73.406,8.635 73.534,8.763 74.289,8.763 74.417,8.635 74.417,8.382 ; J2.A7 74.413,7.676 74.413,8.376 74.418,8.381
USB_P: J2.A6 J2.B6 U4.3 | length 8.2
  Top Layer w0.219: J2.A6 73.958,7.631 73.958,6.859 74.087,6.731 74.795,6.731 74.924,6.859 J2.B6@74.924,7.671 ; J2.B6 74.93,7.683 74.93,9.652 74.378,10.204 74.378,10.843 75.118,11.583 U4.3
VBUS_2: C8.2 C9.2 D2.A J2.A4_B9 J2.B4_A9 U3.4 U3.16 | length 16.1
  Top Layer w2: 54.737,6.096 54.737,5.109 55.909,3.937 66.138,3.937 67.31,5.109 D2.A
pads on no net: J1. J2. J2.A8 J2.B8 U2.4 U2.5 U2.6 U2.7 U2.8 U2.9 U2.11 U2.17 U2.18 U2.19 U2.20 U2.21 U2.22 U2.23 U2.26 U2.27 U2.29 U2.32 U3.7 U3.8 U3.9 U3.10 U3.11 U3.12 U3.15 U5.1 U5.2 U5.3 U5.14 U5.15 U5.16

## Polygon pours and split planes (outlines as drawn)
GND on Bottom Layer "NONET_L-01_P-001" (solid, remove dead copper, pour order 0): 39.878,63.881 39.878,54.61 44.196,54.61 50.927,47.879 53.975,47.879 53.975,29.464 21.59,29.464 21.59,15.621 -0.127,15.621 -0.127,0.254 86.106,0.254 86.106,5.08 86.106,63.881
GND on Top Layer "NONET_L-01_P-001" (solid, remove dead copper, pour order 2): 40.005,63.881 40.005,54.61 44.196,54.61 50.927,47.879 53.975,47.879 53.975,29.464 21.59,29.464 21.59,15.621 0.127,15.621 0,15.494 0,0.127 9.906,0.127 10.033,0 86.106,0 86.106,63.881

## Keep-outs
Keep-Out Layer:
  the board outline again, w0.254

## Other copper
Top Layer:
  region net 3V3: 76.581,18.415 79.248,18.415 79.248,17.018 76.581,17.018
  region net 3V3: 84.709,52.07 84.709,54.102 85.598,54.102 85.598,52.07
  region net VBUS_2: 76.261,6.996 75.107,5.842 76.578,5.842 76.578,6.933
  region net VBUS_2: 72.009,6.985 73.152,5.842 73.152,5.334 71.882,5.334 71.882,6.858
  region net VBUS_2: 67.945,5.842 76.581,5.842 76.581,4.445 67.945,4.445
  region net VBUS_2: 76.769,8.266 76.769,7.123 76.388,6.742 76.388,5.726 76.261,5.726 76.261,8.266
  region net VBUS_2: 71.501,8.255 71.501,7.112 71.882,6.731 71.882,5.715 72.009,5.715 72.009,8.255
  region net VBUS_2: 64.77,9.779 64.77,6.477 68.326,6.477 68.326,7.747 65.659,7.747 65.659,9.779
  region net NetC3_2: 19.939,6.985 19.939,3.175 31.623,3.175 31.813,3.365 31.813,6.731 30.734,6.731 30.353,6.35 30.353,4.064 20.701,4.064 20.701,6.985
  region net 3V3: 61.087,35.814 61.087,34.036 63.754,34.036 63.754,35.814
  region net +5: 66.167,9.652 66.167,12.192 70.485,12.192 70.485,9.652
  region net +5: 36.957,14.478 36.957,12.573 38.481,12.573 38.481,14.478
  region net 3V3: 61.087,48.006 61.087,50.165 63.5,50.165 63.5,48.006
  region net 3V3: 74.295,51.435 74.295,49.657 67.437,49.657 67.437,51.435
  region net +5: 73.787,15.748 73.787,13.589 76.073,13.589 76.454,13.208 77.343,13.208 77.343,15.621 76.073,15.621 76.073,14.351 75.819,14.097 74.549,14.097 74.549,15.748
  region net 3V3: 78.232,14.224 79.248,14.224 79.248,18.415 78.232,18.415
  region net +5V: 37.211,11.811 37.211,9.779 49.784,9.779 49.784,11.811 48.768,11.811 48.768,10.541 38.227,10.541 38.227,11.811
  region net +5: 17.78,8.509 17.78,3.048 19.304,3.048 19.304,8.509
  region net NetC3_2: 29.464,6.985 29.464,5.588 32.893,5.588 32.893,6.731 30.734,6.731 30.734,6.985
  region net VBUS_2: 53.721,7.239 55.245,7.239 55.499,6.985 56.896,6.985 56.896,6.223 53.721,6.223
  region net VBUS_2: 60.706,10.795 65.659,10.795 65.659,9.652 62.738,9.652 62.357,10.033 60.706,10.033
  region net +5V: 51.562,14.732 51.562,12.192 49.784,12.192 49.784,11.811 49.53,11.557 48.768,11.557 48.768,14.732
  region net +5V: 46.382,26.416 46.382,18.076 47.525,18.076 47.525,19.346 48.16,19.346 49.43,20.616 49.43,26.416
  region net +5V: 38.354,26.416 38.354,18.076 39.651,18.076 39.651,19.346 40.286,19.346 41.556,20.616 41.556,26.416
  region net +5V: 30.607,26.543 30.607,18.076 31.777,18.076 31.777,19.346 32.412,19.346 33.682,20.616 33.682,26.543
  region net +5V: 22.733,26.416 22.733,18.161 23.876,18.161 23.876,19.431 24.511,19.431 25.781,20.701 25.781,26.416
  region net 3V3: 25.527,14.351 36.195,14.351 36.195,12.446 29.718,12.446 29.083,11.811 25.527,11.811
  region net +5: 5.08,14.224 5.08,12.319 3.048,12.319 3.048,14.224
  region net +5: 3.048,14.224 3.048,5.461 4.699,5.461 4.699,14.224
  region net +3V3: 83.058,53.34 83.058,47.879 83.566,47.371 83.566,44.704 84.455,44.704 84.455,48.133 84.201,48.387 84.201,53.34
  text "VIETTIEN" at 44.796,59.182 h1.52

## Silkscreen, mask and mechanical layers (free items; w line width, h text height)
Top Overlay:
  text "AC INPUT" at 2.43,54.61 h1.52 r270
  text "EXTRA" at 41.591,53.729 h1.52 r270
  text "SW1" at 45.483,53.721 h1.52 r270
  text "SW2" at 49.801,53.721 h1.52 r270
  text "SW3" at 53.484,53.721 h1.52 r270
  text "SW4" at 57.167,53.721 h1.52 r270
  text "SW5" at 61.104,53.721 h1.52 r270
  text "RL1" at 21.209,52.597 h1.52 r270
  text "RL2" at 24.937,52.597 h1.52 r270
  text "RL3" at 29.018,52.597 h1.52 r270
  text "RL4" at 33.02,52.597 h1.52 r270
  text "SCL" at 86.341,16.527 h1.52
  text "SDA" at 86.341,14.413 h1.52
  text "5V" at 86.341,12.254 h1.52
  text "PWR" at 11.368,6.85 h1.52 r90
Bottom Overlay:
  text "IO17" at 43.721,53.212 h1.52
  text "IO13" at 47.785,53.212 h1.52
  text "IO12" at 51.463,53.212 h1.52
  text "IO27" at 55.151,53.212 h1.52
  text "IO14" at 59.086,53.212 h1.52
  text "IO22" at 87.15,16.273 h1.52
  text "IO21" at 87.061,14.368 h1.52

## Text inside footprints (layer, text, board x,y; h text height)
U2: Mechanical 13 "ANTENNA" at 89.034,43.284 h1.78 r270